# Altium PCB AltiumSTM32_PCB.PcbDoc
Units mm, origin at the board's own origin, x right, y up, seen from the top; angles counter-clockwise.
Board outline 40 x 40 mm, 4 copper layers (L1 (Signal), L2 (GND), L3 (GND), L4 (Signal)), stack 1.591 mm thick; 35 components, 27 nets, 170 pads, 151 vias.
Unrouted connection lines stored in the file: 3.
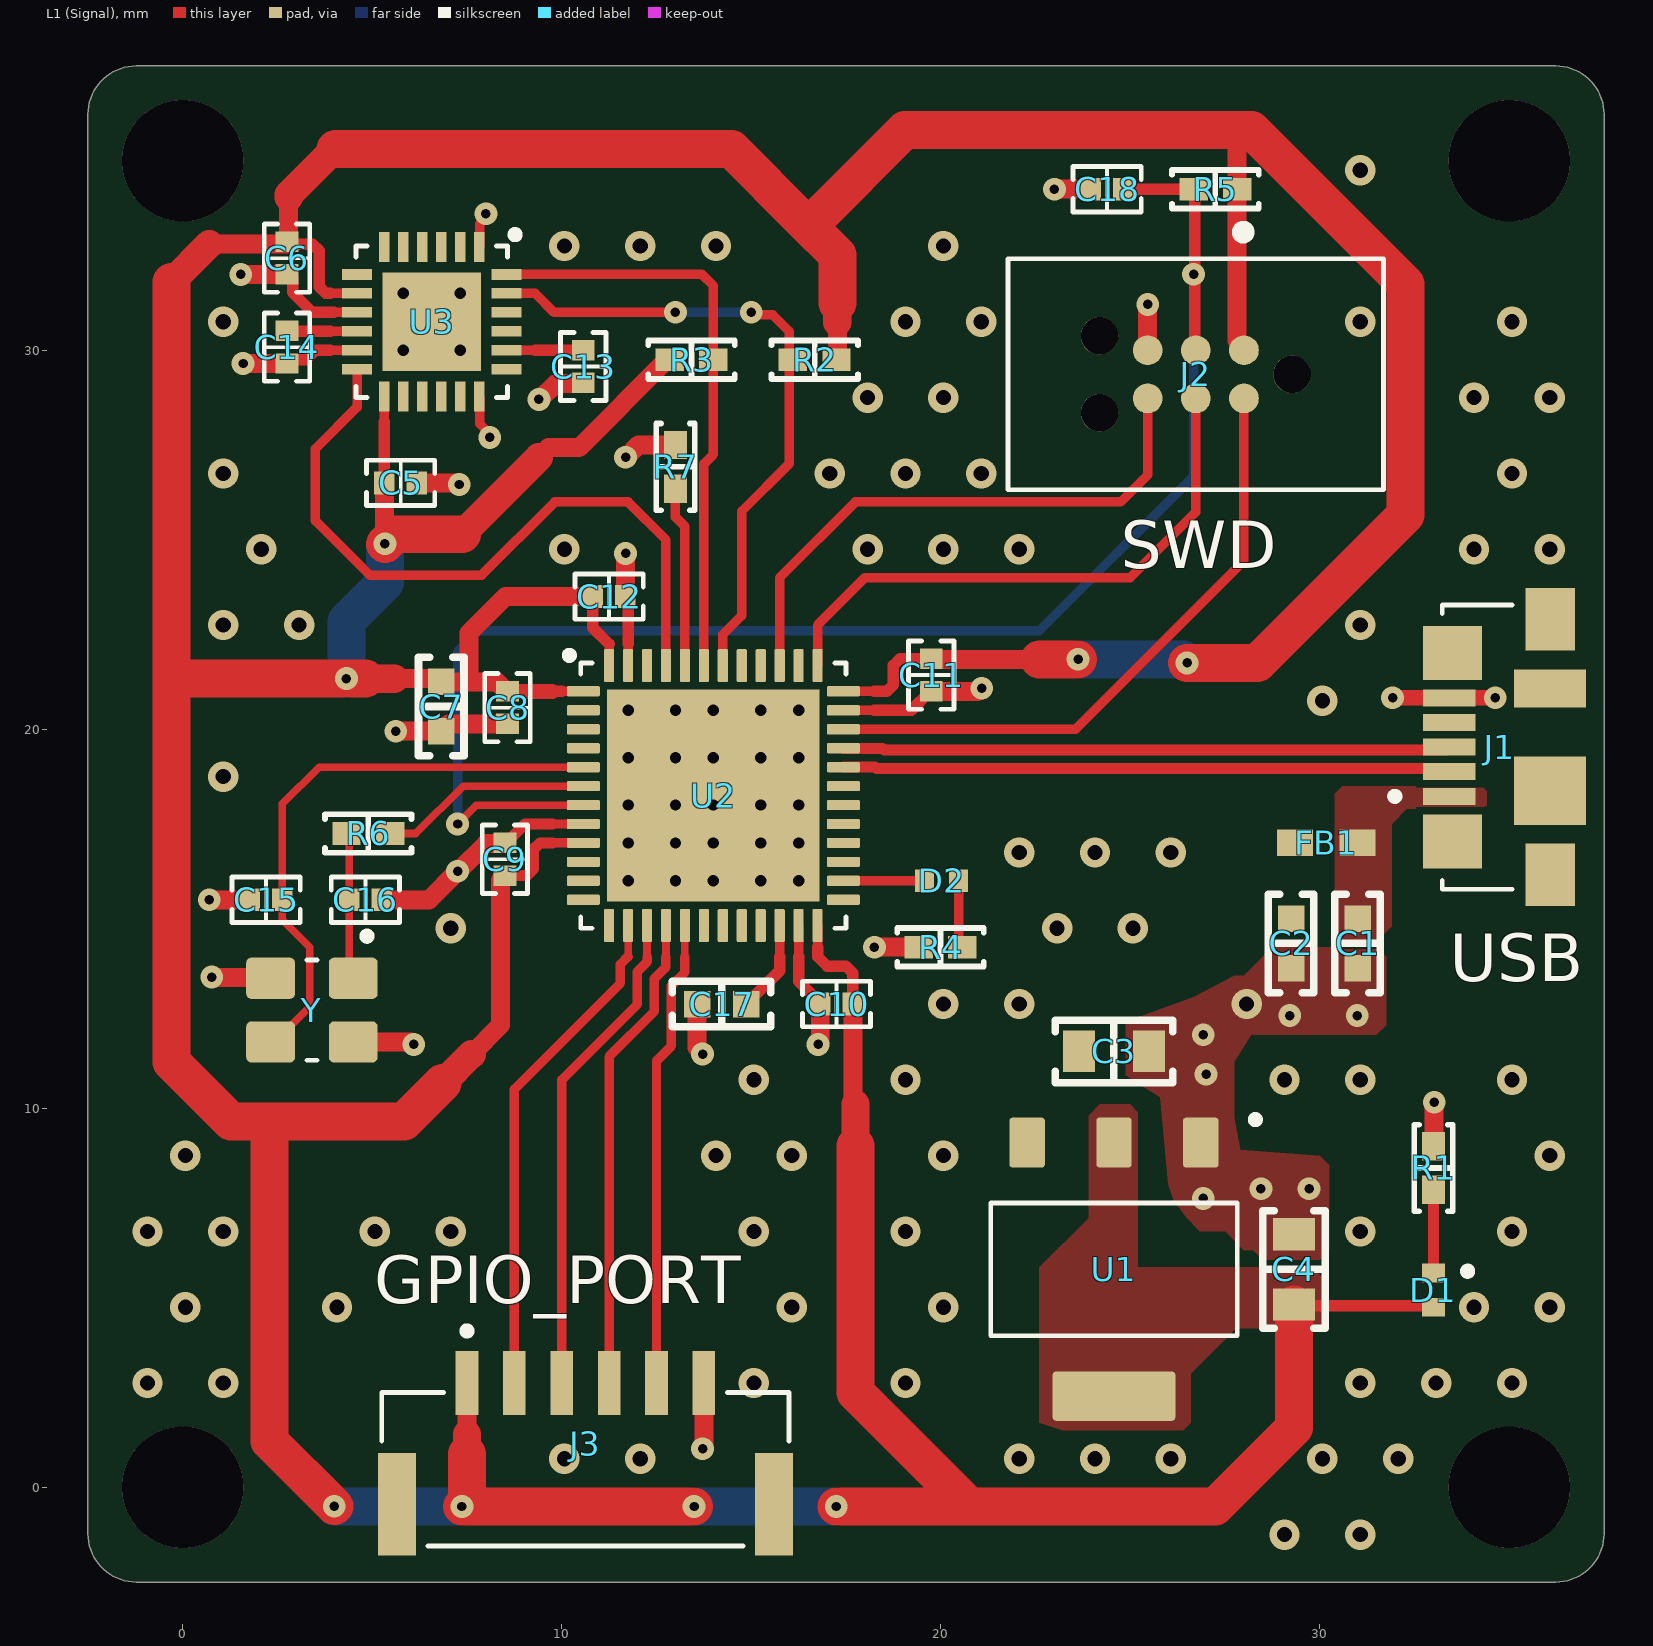
[diagram p0: L1 (Signal) view]
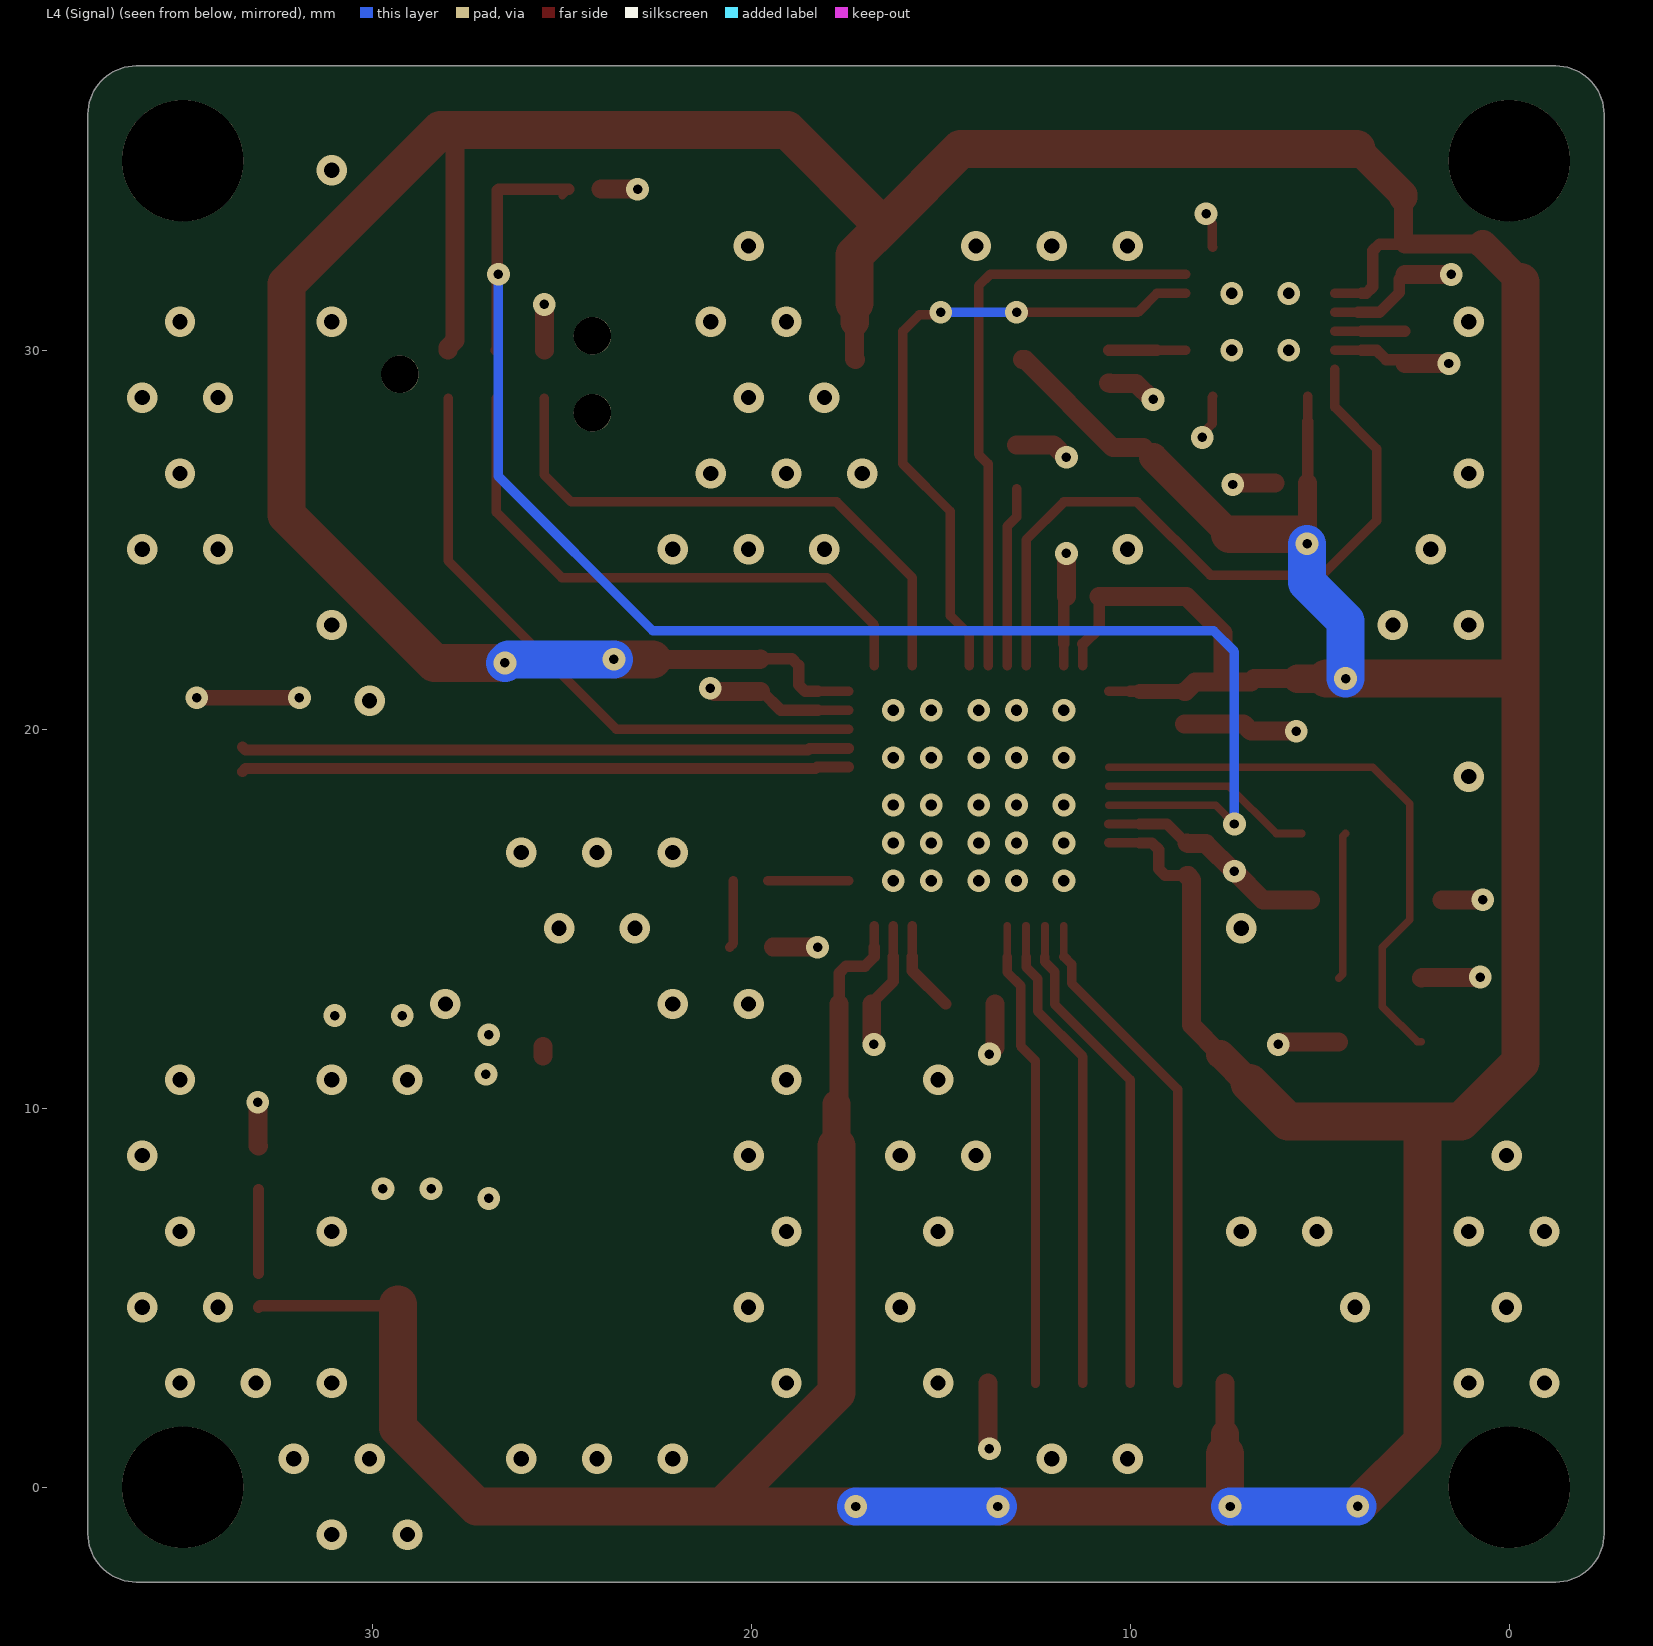
[diagram p1: L4 (Signal) view, seen from below]
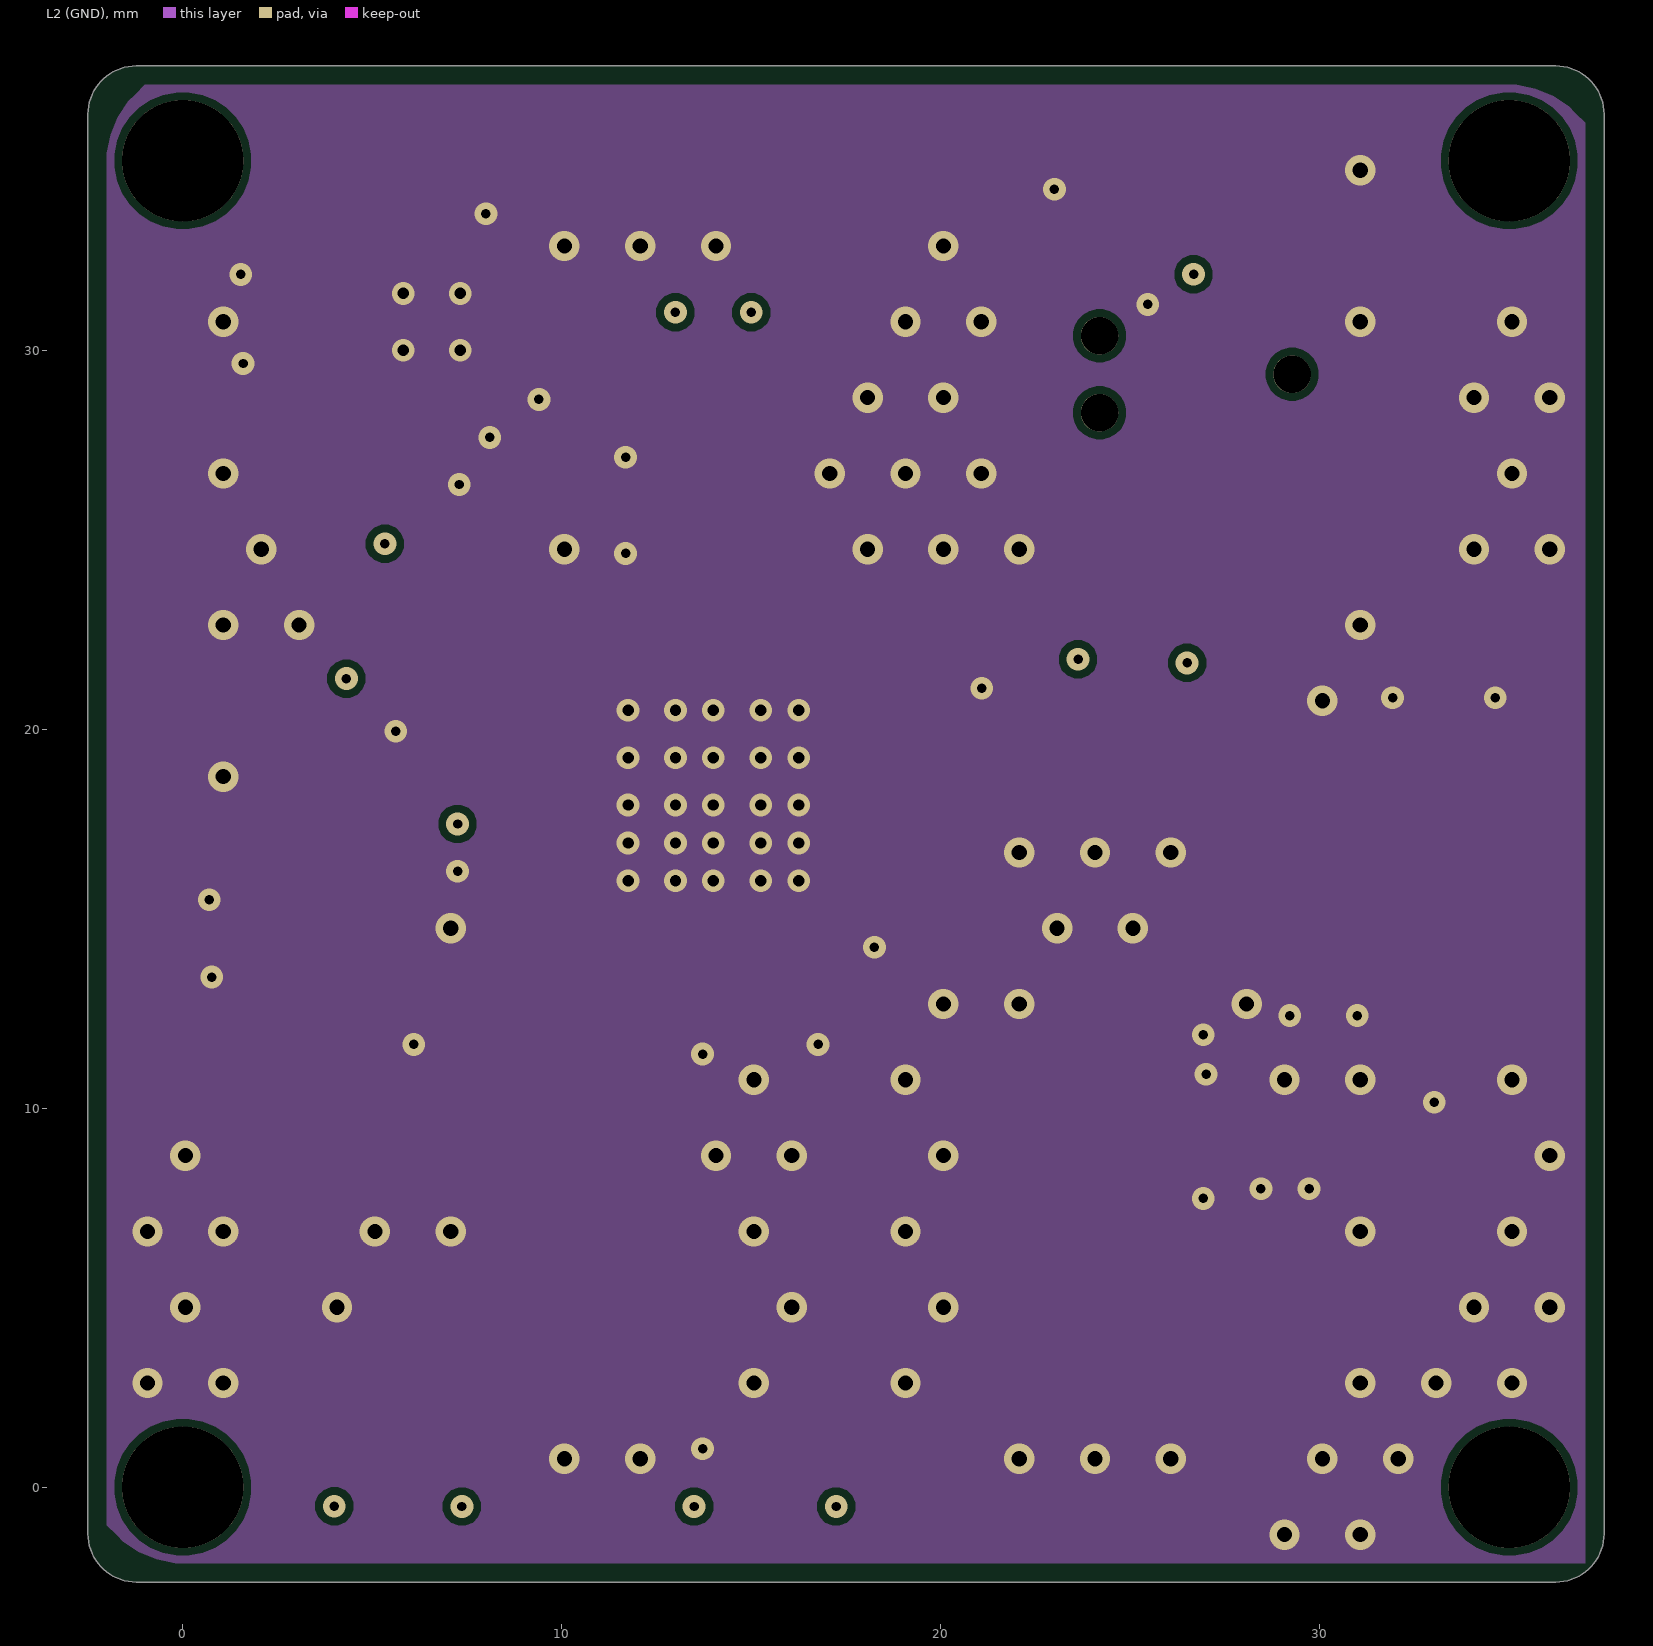
[diagram p2: L2 (GND)]
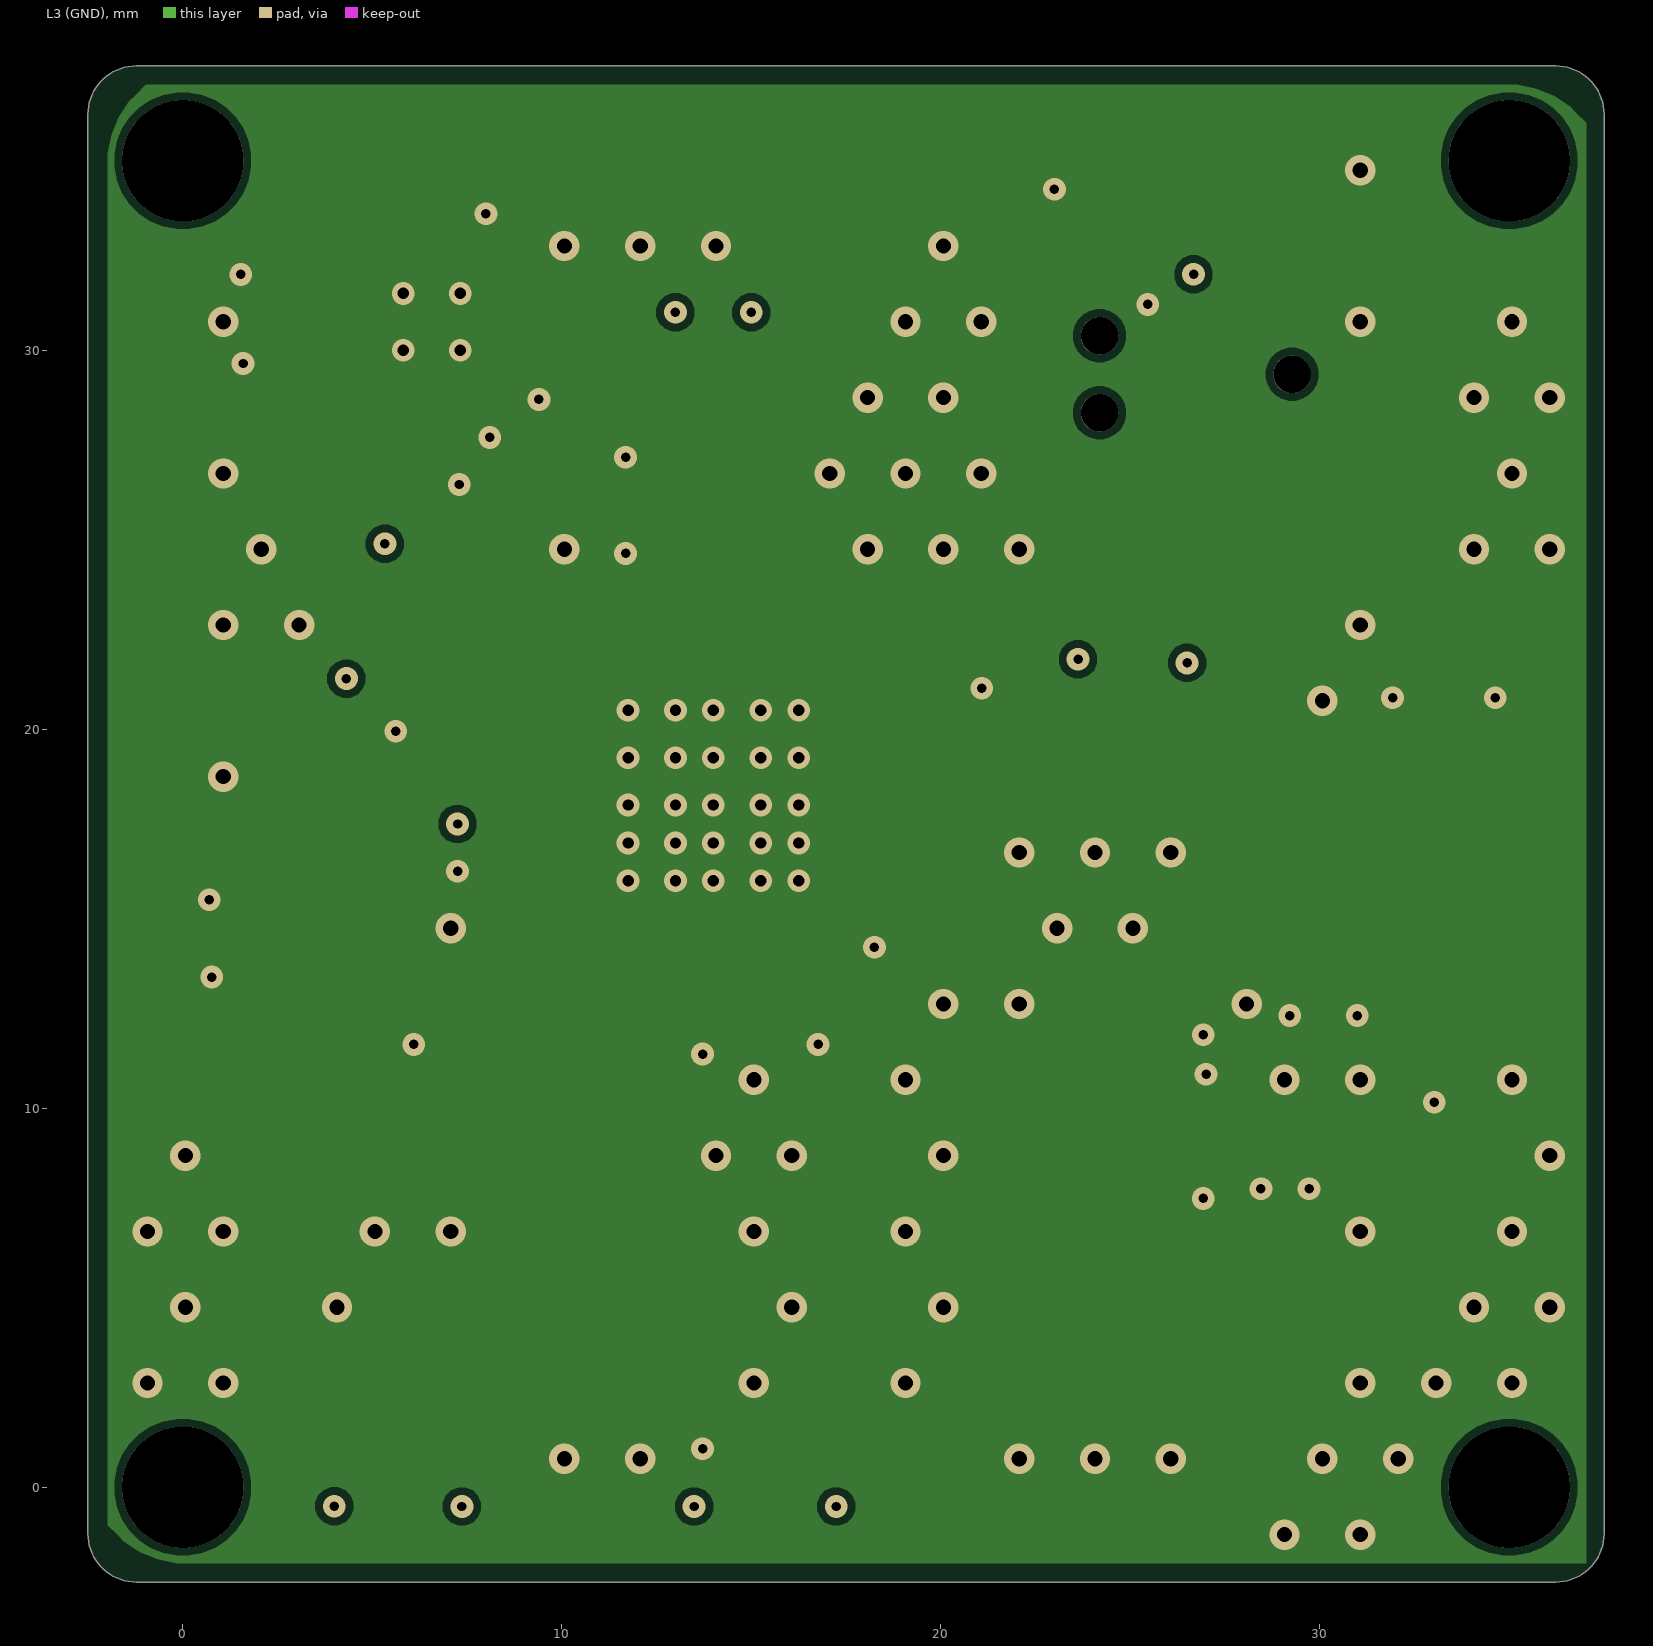
[diagram p3: L3 (GND)]

## Layer stack, top to bottom
Top Solder: solder mask 0.0254, SM-001, Dk 4
L1 (Signal): signal copper 0.035
Dielectric 1: prepreg 0.2104, PP-017, Dk 4.3
L2 (GND): signal copper 0.0175
Dielectric 3: core 1.065, Core-039, Dk 4.8
L3 (GND): signal copper 0.0175
Dielectric 5: prepreg 0.2104, PP-017, Dk 4.3
L4 (Signal): signal copper 0.035
Bottom Solder: solder mask 0.0254, SM-001, Dk 4

## Board outline
-2.5,-1.23 ccw(c-1.23,-1.23) -1.23,-2.5 36.23,-2.5 ccw(c36.23,-1.23) 37.5,-1.23 37.5,36.23 ccw(c36.23,36.23) 36.23,37.5 -1.23,37.5 ccw(c-1.23,36.23) -2.5,36.23

## Design rules (kind name [scope] priority, off if disabled: settings)
Clearance [All] p1: gap=0.2 ignorepadtopadclearanceinfootprint=TRUE except(0: Arc-Hole Track-Hole SMDPad-Hole THPad-Hole Via-Hole Fill-Hole Poly-Hole Region-Hole Text-Hole; 0.25: Via-Via)
DiffPairsRouting [All] p1: maxlimit=0.254 minlimit=0.203 mostfreqgap=0.254 toplayer_maxgap=0.203 toplayer_prefgap=0.203 toplayer_minwidth=0.287 toplayer_maxwidth=0.287 toplayer_prefwidth=0.287 bottomlayer_maxgap=0.203 bottomlayer_prefgap=0.203 bottomlayer_minwidth=0.287 bottomlayer_maxwidth=0.287 bottomlayer_prefwidth=0.287 impedanceprofiledriven=TRUE impedanceprofileid={58C25E6C-3278-4929-8B5A-89BDB804C8F2} impedanceprofilevalue=90.000000 maxuncoupledlength=12.7
HoleSize [All] p1: absolutevalues=TRUE maxlimit=6.3 minlimit=0.15 maxpercent=80.000 minpercent=20.000
HoleToHoleClearance [All] p1: gap=0.45 allowstackedmicrovias=TRUE
MinimumSolderMaskSliver [All] p1: minsoldermaskwidth=0
PolygonConnect [All] p1: connectstyle=Direct reliefconductorwidth=0.254 reliefentries=4 polygonreliefangle="90 Angle" airgapwidth=0.254
RoutingVias [All] p1: holewidth=0.3 width=0.7 viastyle="Through Hole" minholewidth=0.25 minwidth=0.55 maxholewidth=0.4 maxwidth=0.9
SilkToSilkClearance [All] p1: silktosilkclearance=0.15
SilkToSolderMaskClearance [IsPad] p1: minsilkscreentomaskgap=0.075 clearancetoexposedcopper=TRUE
SolderMaskExpansion [All] p1: expansion=0.102 istentingtop=FALSE
UnRoutedNet [All] p1: checkbadconnections=TRUE
Width [All] p1: maxlimit=1 minlimit=0.2 preferedwidth=0.3 midlayer1_minwidth=0.254 midlayer1_maxwidth=0.254 midlayer1_prefwidth=0.254 midlayer2_minwidth=0.254 midlayer2_maxwidth=0.254 midlayer2_prefwidth=0.254 minimp=50.000000 maximp=50.000000 favimp=50.000000
23 further rules are at their usual default settings.

## Classes and differential pairs
net class DIFF_USB: USB_D_N USB_D_P
differential pair USB_D: +USB_D_P -USB_D_N

## Components (designator, comment, footprint, x,y, rotation, side; value= is the part's Value field where it differs from the comment)
C1 "2u2F" C0603 31,14.35 r90 top
C2 "2u2F" C0603 29.245,14.35 r90 top
C3 "22uF" C0805 24.57,11.5 r180 top
C4 "22uF" C0805 29.32,5.75 r270 top
C5 "100nF" C0402 5.75,26.5 r0 top
C6 "10nF" C0402 2.75,32.43 r270 top
C7 "2u2F" C0603 6.82,20.6 r90 top
C8 "100nF" C0402 8.57,20.57 r90 top
C9 "100nF" C0402 8.5,16.57 r270 top
C10 "100nF" C0402 17.25,12.75 r0 top
C11 "100nF" C0402 19.75,21.43 r90 top
C12 "100nF" C0402 11.25,23.5 r180 top
C13 "2n2F" C0402 10.57,29.57 r90 top
C14 "100nF" C0402 2.75,30.08 r90 top
C15 "10pF" C0402 2.2,15.5 r0 top
C16 "10pF" C0402 4.82,15.5 r180 top
C17 "2u2F" C0603 14.22,12.75 r0 top
C18 "100nF" C0402 24.39,34.25 r0 top
D1 "SML-P11VTT86R" LED_SML-P11VTT86R 33,5.2 r270 top
D2 "SML-P11VTT86R" LED_SML-P11VTT86R 20.02,16 r180 top
FB1 "120R" WE-CBF_0603_W2.6 30.175,17 r180 top
J1 "47346-0001" MOLEX_47346-0001 36.08,19.53 r90 top
J2 "DNP" TAG_TC2030-IDC-NL 26.73,29.365 r180 top
J3 "SM06B-GHS-TB" JST_SM06B-GHS-TB 10.625,0.875 r0 top
R1 "1k" R0402_1005 33,8.425 r270 top
R2 "2k2" R0402_1005 16.675,29.75 r0 top
R3 "2k2" R0402_1005 13.425,29.75 r180 top
R4 "1k" R0402_1005 19.995,14.25 r0 top
R5 "10k" R0402_1005 27.245,34.25 r0 top
R6 "0R" R0402_1005 4.895,17.25 r0 top
R7 "10k" R0402_1005 13,26.925 r270 top
U1 "AMS1117-3.3" SOT229P700X180-4N 24.57,5.75 r270 top
U2 "STM32F411CEU6" QFN50P700X700X60-49N 14,18.25 r0 top
U3 "MPU-6050-A" QFN50P400X400X95-24N 6.57,30.75 r270 top
Y "TSX-322524.0000MF15X-AC3" OSCCC320X250X60 3.41,12.59 r270 top

## Footprints (in the part's own frame and the unit in brackets; to place one, negate y for a bottom-side part, rotate by r counter-clockwise, add the part's x,y. Pads: shape width x height; smd on the part's side, far side on the other; paste and mask are expansions set on the pad)
C0402 [mm]
  rect 0.54x0.6 smd paste+0 mask+0.102: 1(-0.43,0) 2(0.43,0)
  silkscreen extent -0.9,-0.6 0.9,0.6, body extent -0.5,-0.25 0.5,0.25, height 0.55
C0603 [mm] "Chip Capacitor, 2-Leads, Body 1.60x0.80mm, IPC Medium Density"
  rect 0.7x0.7 smd: 1(-0.65,0) 2(0.65,0)
  silkscreen extent -1.3,-0.6 1.3,0.6, body extent -0.8,-0.4 0.8,0.4, height 0.7
C0805 [mm] "J2, Film Capacitor PPS , 2-Leads, Body 2.00x1.25mm, IPC Medium Density"
  rect 0.85x1.1 smd: 1(-0.925,0) 2(0.925,0)
  silkscreen extent -1.55,-0.82 1.55,0.82, body extent -1,-0.62 1,0.62, height 1.2
JST_SM06B-GHS-TB [mm]
  rect 0.6x1.7 smd paste+0 mask+0.102: 1(-3.125,1.875) 2(-1.875,1.875) 3(-0.625,1.875) 4(0.625,1.875) 5(1.875,1.875) 6(3.125,1.875)
  rect 1x2.7 smd paste+0 mask+0.102: MP1(-4.975,-1.325) MP2(4.975,-1.325)
  silkscreen extent -5.38,-2.42 5.38,3.35, body extent -5.38,-2.05 5.38,2.8, height 4.25
LED_SML-P11VTT86R [mm]
  rect 0.5x0.6 smd: A(0.45,0) K(-0.45,0)
  silkscreen extent -0.6,0.8 -0.4,1, body extent -0.5,-0.3 0.5,0.3, height 0.21
MOLEX_47346-0001 [mm]
  rect 0.45x1.38 smd: 1(-1.3,2.66) 2(-0.65,2.66) 3(0,2.66) 4(0.65,2.66) 5(1.3,2.66)
  rect 1.425x1.55 smd: S1(-2.488,2.575) S2(2.488,2.575)
  rect 1.65x1.3 smd: S3(-3.375,0) S6(3.375,0)
  rect 1.8x1.9 smd: S4(-1.15,0)
  rect 1x1.9 smd: S5(1.55,0)
  silkscreen extent -3.75,1 3.75,4.2, body extent -4.05,-2.42 4.31,3.01, height 2.7
OSCCC320X250X60 [mm]
  rrect25% 1.09x1.29 smd: 1(-0.84,1.09) 2(-0.84,-1.09) 3(0.84,-1.09) 4(0.84,1.09)
  silkscreen extent -2.05,-0.13 1.33,1.55, body extent -1.25,-1.6 1.25,1.6, height 0.6
QFN50P400X400X95-24N [mm]
  rect 0.79x0.28 smd: 1(-1.97,1.25) 2(-1.97,0.75) 3(-1.97,0.25) 4(-1.97,-0.25) 5(-1.97,-0.75) 6(-1.97,-1.25) 13(1.97,-1.25) 14(1.97,-0.75) 15(1.97,-0.25) 16(1.97,0.25) 17(1.97,0.75) 18(1.97,1.25)
  rect 0.28x0.79 smd: 7(-1.25,-1.97) 8(-0.75,-1.97) 9(-0.25,-1.97) 10(0.25,-1.97) 11(0.75,-1.97) 12(1.25,-1.97) 19(1.25,1.97) 20(0.75,1.97) 21(0.25,1.97) 22(-0.25,1.97) 23(-0.75,1.97) 24(-1.25,1.97)
  rect 2.6x2.6 smd mask+0.07: 18(0,0)
  silkscreen extent -2.4,-2 2,2.3, body extent -2,-2 2,2, height 0.93
QFN50P700X700X60-49N [mm]
  rrect25% 0.87x0.27 smd: 1(-3.43,2.75) 2(-3.43,2.25) 3(-3.43,1.75) 4(-3.43,1.25) 5(-3.43,0.75) 6(-3.43,0.25) 7(-3.43,-0.25) 8(-3.43,-0.75) 9(-3.43,-1.25) 10(-3.43,-1.75) 11(-3.43,-2.25) 12(-3.43,-2.75) 25(3.43,-2.75) 26(3.43,-2.25) 27(3.43,-1.75) 28(3.43,-1.25) 29(3.43,-0.75) 30(3.43,-0.25) 31(3.43,0.25) 32(3.43,0.75) 33(3.43,1.25) 34(3.43,1.75) 35(3.43,2.25) 36(3.43,2.75)
  rrect25% 0.27x0.87 smd: 13(-2.75,-3.43) 14(-2.25,-3.43) 15(-1.75,-3.43) 16(-1.25,-3.43) 17(-0.75,-3.43) 18(-0.25,-3.43) 19(0.25,-3.43) 20(0.75,-3.43) 21(1.25,-3.43) 22(1.75,-3.43) 23(2.25,-3.43) 24(2.75,-3.43) 37(2.75,3.43) 38(2.25,3.43) 39(1.75,3.43) 40(1.25,3.43) 41(0.75,3.43) 42(0.25,3.43) 43(-0.25,3.43) 44(-0.75,3.43) 45(-1.25,3.43) 46(-1.75,3.43) 47(-2.25,3.43) 48(-2.75,3.43)
  rect 5.6x5.6 smd paste-4: 49(0,0)
  silkscreen extent -3.9,-3.5 3.5,3.8, body extent -3.5,-3.5 3.5,3.5, height 0.6
R0402_1005 [mm] "Chip Resistor, 2-Leads, Body 1.0x0.5mm, IPC Medium Density"
  rect 0.75x0.6 smd: 1(-0.575,0) 2(0.575,0)
  silkscreen extent -1.14,-0.51 1.14,0.51, body extent -0.5,-0.25 0.5,0.25, height 0.35
SOT229P700X180-4N [mm]
  rrect15% 1.31x0.93 smd: 1(-3.345,2.29) 2(-3.345,0) 3(-3.345,-2.29)
  rrect15% 1.31x3.24 smd: 2(3.345,0)
  silkscreen extent -4.05,-3.25 1.75,3.83, body extent -3.4,-3.25 3.6,3.25, height 1.8
TAG_TC2030-IDC-NL [mil]
  round 30.98 smd paste-39.37: 1(-50,-25) 2(-50,25) 3(0,-25) 4(0,25) 5(50,-25) 6(50,25)
  round 39.02 hole 39.02 unplated: ""(-100,0) ""(100,-40) ""(100,40)
  silkscreen extent -195,-154 195,120
WE-CBF_0603_W2.6 [mm]
  rect 0.95x0.7 smd: 1(-0.825,0) 2(0.825,0)
  body extent -0.8,-0.4 0.8,0.4, height 0.81

## Part data
C1 C2 C7 C17: library part CAP_0603_10V, "SMD Capacitor", Dielectric=?, Package=C0603, Voltage=10V, Excepted=?, Manufacturer Reference=?, Power=?, Tolerance=?
C3 C4: library part CAP_0805_16V, "SMD Capacitor", Dielectric=?, Package=C0805, Voltage=16V, Excepted=?, Manufacturer Reference=?, Power=?, Tolerance=?
C5 C6 C8 C9 C10 C11 C12 C13 C14 C18: library part CAP_0402_10V, "SMD Capacitor", Dielectric=?, Package=C0402, Tolerance=10%, Voltage=10V, Excepted=?, Manufacturer Reference=?, Power=?
C15 C16: library part CAP_0402_16V, "SMD Capacitor", Dielectric=?, Package=C0402, Voltage=16V, Excepted=?, Manufacturer Reference=?, Power=?, Tolerance=?
D1 D2: "Red 626nm LED Indication SMD - Discrete 1.8V 0402 (1006 Metric)", Package="0402 Rohm", Check_prices=https://www.snapeda.com/parts/SML-P11VTT86R/Rohm/view-part/?ref=eda, Digi-Key_Part_Number=846-SML-P11VTT86RTR-ND, MF=Rohm, MP=SML-P11VTT86R, Purchase-URL=https://pricing.snapeda.com/search?q=SML-P11VTT86R&ref=eda, SnapEDA_Link=https://www.snapeda.com/parts/SML-P11VTT86R/Rohm/view-part/?ref=snap
FB1: library part 742792625, "Multilayer Chip Ferrite Bead 0603 120R 2A", Package="0603 Wurth Elektronik", Check_prices=https://www.snapeda.com/parts/742792625/W%25C3%25BCrth+Elektronik+Midcom/view-part/?ref=eda, MF="WÃ¼rth Elektronik", MP=742792625, SnapEDA_Link=https://www.snapeda.com/parts/742792625/W%25C3%25BCrth+Elektronik+Midcom/view-part/?ref=snap
J1: "Conn Data USB Micro B w/Flange SMT Bottom Mnt LF", Package=None, Check_prices=https://www.snapeda.com/parts/47346-0001/Molex/view-part/?ref=eda, MF=Molex, MP=47346-0001, SnapEDA_Link=https://www.snapeda.com/parts/47346-0001/Molex/view-part/?ref=snap
J2: library part TC2030-NL, "Tag connect , CABLE ADAPTER 6 POS", Package=None, Availability=Unavailable, MP=TC2030-IDC-NL, Price=None
J3: "Connector Header Surface Mount, Right Angle 6 position 0.049 (1.25mm)", Package=None, Check_prices=https://www.snapeda.com/parts/SM06B-GHS-TB/JST/view-part/?ref=eda, MF="JST Sales", MP=SM06B-GHS-TB, SnapEDA_Link=https://www.snapeda.com/parts/SM06B-GHS-TB/JST/view-part/?ref=snap
R1 R2 R3 R4 R5 R6 R7: library part Resistor, "SMD Resistor", Dielectric=?, Excepted=?, Manufacturer Reference=?, Package=?, Power=?, Tolerence=?, Voltage=?
U1: "Sot223/Pkg 1-Amp 3.3-Volt Low Drop Out Voltage Regulatator", Package="SOT-223 Seeed Technology", Check_prices=https://www.snapeda.com/parts/AMS1117-3.3/Advanced+Monolithic+Systems/view-part/?ref=eda, MF="Advanced Monolithic Systems", MP=AMS1117-3.3, SnapEDA_Link=https://www.snapeda.com/parts/AMS1117-3.3/Advanced+Monolithic+Systems/view-part/?ref=snap
U2: "High-performance access line, ARM Cortex-M4 core with DSP and FPU, 512 Kbytes Flash, 100 MHz CPU, ART Accelerator", Package=None, Availability=Unavailable, MP=STM32F411CEU6, Price=None
U3: Package=None, Check_prices=https://www.snapeda.com/parts/MPU-6050-A/InvenSense/view-part/?ref=eda, MF="TDK InvenSense", MP=MPU-6050-A, SnapEDA_Link=https://www.snapeda.com/parts/MPU-6050-A/InvenSense/view-part/?ref=snap
Y: "24MHz Â±10ppm Crystal 9pF 40 Ohms 4-SMD, No Lead", Package="SMD-4 EPSON", Availability=Unavailable, MF=EPSON, MP="TSX-3225 24.0000MF15X-AC3", Price=None, SnapEDA_Link=https://www.snapeda.com/parts/TSX-3225%2024.0000MF15X-AC3/EPSON/view-part/230042/?ref=snap

## Free pads (board coordinates)
  round 3.2 hole 3.2 unplated: MH(0,0) MH(0,35) MH(35,0) MH(35,35)

## Via types
v1: diameter 0.8, hole 0.4, L1 (Signal) to L4 (Signal), tented both sides, 80 vias
v2: diameter 0.6, hole 0.25, L1 (Signal) to L4 (Signal), 42 vias
v3: diameter 0.6, hole 0.3, L1 (Signal) to L4 (Signal), 29 vias

## Nets (pads, with @x,y where several pads share a name; then routed paths per layer and width w, separated by ;. In a path a pad name is that pad's centre, name@x,y a point inside that pad or via, vN(x,y) a via of type N, cw(c..) or ccw(c..) an arc to the next point about the centre after c; other vN are vias at no path point)
+3V3: C4.2 C5.1 C6.1 C7.2 C8.2 C9.2 C10.2 C11.2 C12.2 D1.A J2.1 J3.1 R2.2 R3.2 R5.2 U1.2 U2.1 U2.9 U2.24 U2.36 U2.48 U3.8 U3.13 | length 211.9
  L1 (Signal) w0.25: 3.9,31.5 U3.8 ; 5.32,28.12 U3.13 ; 9.75,17 U2.9 ; 10,21 U2.1 ; U2.48 11.25,22.25 ; 16.75,14.25 U2.24 ; U2.36 18.25,21
  L1 (Signal) w0.3: C6.1@2.81,32.8 3.424,32.8 3.6,32.624 3.6,31.676 3.776,31.5 3.9,31.5 ; C5.1 5.32,28.12 ; C9.2 9.074,16.14 9.25,16.316 9.25,16.824 9.426,17 9.75,17 ; 9.75,21 10,21 ; C12.2 10.82,22.68 11.25,22.25 ; 16.75,14.25 16.75,14 17,13.75 17.5,13.75 17.68,13.57 C10.2 ; 18.25,21 18.574,21 18.75,21.176 18.75,21.684 18.926,21.86 C11.2 ; C4.2 29.357,4.788 32.962,4.788 D1.A
  L1 (Signal) w0.4: C8.2 9.75,21
  L1 (Signal) w0.5: 0.7,32.8 C6.1@2.75,32.8 ; C6.1@2.794,32.88 2.794,34.036 ; C5.1 5.327,26.493 5.327,24.899 v2(5.334,24.892) ; 5.588,21.336 6.734,21.336 C7.2 7.555,21.25 ; 7.5,1.404 J3.1 ; 7.62,11.43 8.382,12.192 8.382,16.022 8.45,16.09 8.45,16.12 8.47,16.14 C9.2 ; C8.2 8.54,21 8.29,21.25 7.555,21.25 ; 9.398,27.178 9.652,27.432 10.457,27.432 12.775,29.75 R3.2 ; C12.2 8.514,23.5 7.555,22.541 7.555,21.25 ; R2.2 17.272,29.772 17.272,30.734 ; C10.2 17.68,10.18 17.75,10.11 ; C11.2 19.766,21.844 22.606,21.844 ; 27.686,35.814 27.82,35.68 27.82,30.258 28,30.078 J2.1
  L1 (Signal) w0.75: -0.3,31.8 0.7,32.8 ; 2.794,34.036 2.794,34.105 3.995,35.306 4.028,35.306 ; 4.826,21.336 5.588,21.336 ; 6.858,10.668 7.62,11.43 ; 7.366,25.146 9.398,27.178 ; 7.5,0.882 7.5,1.404 ; 17.272,30.734 17.272,31.242 ; 17.75,9 17.75,10.11
  L1 (Signal) w1: -0.3,31.8 -0.3,21.336 ; v2(4,-0.5) 2.286,1.214 2.286,9.652 ; 4.028,35.306 14.478,35.306 16.383,33.401 ; 4.826,21.336 v2(4.318,21.336) -0.3,21.336 ; v2(5.334,24.892) 5.588,25.146 7.366,25.146 ; 6.858,10.668 5.842,9.652 2.286,9.652 ; 7.5,0.882 7.5,-0.374 v2(7.366,-0.508) v2(13.492,-0.508) ; v2(17.242,-0.508) 20.758,-0.508 ; 17.272,31.242 17.272,32.512 16.383,33.401 ; 17.75,9 17.75,2.5 20.758,-0.508 ; 22.606,21.844 v2(23.622,21.844) ; v2(26.5,21.75) 28.354,21.75 32.258,25.654 32.258,31.75 28.194,35.814 27.686,35.814 19.05,35.814 16.637,33.401 16.383,33.401 ; C4.2 29.32,1.57 27.242,-0.508 20.828,-0.508 20.758,-0.508 ; -0.3,21.336 -0.3,11.222 1.27,9.652 2.286,9.652
  L4 (Signal) w1: v2(4,-0.5) 4.008,-0.508 v2(7.366,-0.508) ; v2(4.318,21.336) 4.318,22.86 5.334,23.876 v2(5.334,24.892) ; v2(13.492,-0.508) v2(17.242,-0.508) ; v2(23.622,21.844) 26.406,21.844 v2(26.5,21.75)
+5V: C2.2 C3.2 FB1.2 U1.3
GND: C1.1 C2.1 C3.1 C4.1 C5.2 C6.2 C7.1 C8.1 C9.1 C10.1 C11.1 C12.1 C13.1 C14.1 C15.1 C16.1 C17.1 C18.1 J1.5 J2.5 J3.6 R1.1 R4.1 R7.1 U1.1 U2.8 U2.23 U2.35 U2.47 U2.49 U3.1 U3.9 U3.11 U3.18 Y.2 Y.4 | length 47.1
  L1 (Signal) w0.25: 3.9,30 U3.11 ; 3.985,31 U3.9 ; U3.18@7.82,28.78 7.835,28.765 7.835,28.06 8.1,27.795 v2(8.1,27.7) ; U3.1 7.835,32.735 7.835,33.34 8,33.505 v2(8,33.6) ; 9.75,17.5 U2.8 ; U2.47 11.75,22.25 ; 16.25,14 U2.23 ; U2.35 18.25,20.5
  L1 (Signal) w0.3: C14.1 2.853,29.753 3.253,29.753 3.5,30 3.9,30 ; C6.2@2.9,31.88 2.9,31.525 3.425,31 3.985,31 ; C9.1 8.53,17 9.03,17.5 9.75,17.5 ; C12.1 11.75,23.43 11.75,22.25 ; 16.25,14 16.25,13.35 16.82,12.78 C10.1 ; 18.25,20.5 19.22,20.5 19.72,21 C11.1
  L1 (Signal) w0.4: v2(31.92,20.83) J1.5 v2(34.63,20.83) v2@34.65,20.83
  L1 (Signal) w0.5: v2(0.7,15.499) C15.1@1.769,15.499 ; v2(0.762,13.462) 0.778,13.446 2.304,13.446 Y.2 ; v2(1.528,32) C6.2 ; v2(1.592,29.65) C14.1 ; Y.4 6.003,11.75 6.069,11.684 v2(6.096,11.684) ; C16.1 6.5,15.5 v2(7.25,16.25) 7.275,16.25 8.005,16.98 8.48,16.98 C9.1 ; v2(5.621,19.95) C7.1 7.01,20.14 C8.1 ; C5.2 7.228,26.5 7.27,26.458 v2(7.297,26.458) ; v2(9.398,28.702) 9.425,28.702 9.843,29.12 10.52,29.12 10.54,29.14 C13.1 ; C12.1 11.682,23.502 11.682,24.636 v2(11.684,24.638) ; v2(11.684,27.178) 11.701,27.178 12.023,27.5 R7.1 ; C17.1 13.57,11.603 13.716,11.457 v2(13.716,11.43) ; v2(13.716,1.016) 13.716,1.043 13.75,1.077 J3.6 ; v2(16.764,11.684) 16.764,11.711 16.82,11.767 C10.1 ; v2(18.25,14.25) R4.1 ; C11.1 20.973,21 21.055,21.082 v2(21.082,21.082) ; v2(23,34.25) C18.1 ; J2.5 v2(25.46,31.21) ; C3.1@25.495,11.375 C3.1 C3.1@25.495,11.625 ; R1.1 33.01,9.01 33.01,10.15 v2(33.02,10.16)
  other v1: 29.07,-1.25 31.07,-1.25 10.07,0.75 12.07,0.75 22.07,0.75 24.07,0.75 26.07,0.75 30.07,0.75 32.07,0.75 -0.93,2.75 1.07,2.75 15.07,2.75 19.07,2.75 31.07,2.75 33.07,2.75 35.07,2.75 0.07,4.75 4.07,4.75 16.07,4.75 20.07,4.75 34.07,4.75 36.07,4.75 -0.93,6.75 1.07,6.75 5.07,6.75 7.07,6.75 15.07,6.75 19.07,6.75 31.07,6.75 35.07,6.75 0.07,8.75 14.07,8.75 16.07,8.75 20.07,8.75 36.07,8.75 15.07,10.75 19.07,10.75 29.07,10.75 31.07,10.75 35.07,10.75 20.07,12.75 22.07,12.75 28.07,12.75 7.07,14.75 23.07,14.75 25.07,14.75 22.07,16.75 24.07,16.75 26.07,16.75 1.07,18.75 30.07,20.75 1.07,22.75 3.07,22.75 31.07,22.75 2.07,24.75 10.07,24.75 18.07,24.75 20.07,24.75 22.07,24.75 34.07,24.75 36.07,24.75 1.07,26.75 17.07,26.75 19.07,26.75 21.07,26.75 35.07,26.75 18.07,28.75 20.07,28.75 34.07,28.75 36.07,28.75 1.07,30.75 19.07,30.75 21.07,30.75 31.07,30.75 35.07,30.75 10.07,32.75 12.07,32.75 14.07,32.75 20.07,32.75 31.07,34.75
  other v2: 26.924,7.62 28.448,7.874 29.718,7.874 27,10.9 26.924,11.938 29.21,12.446 30.988,12.446
  other v3: 11.75,16 13,16 14,16 15.25,16 16.25,16 11.75,17 13,17 14,17 15.25,17 16.25,17 11.75,18 13,18 14,18 15.25,18 16.25,18 11.75,19.25 13,19.25 14,19.25 15.25,19.25 16.25,19.25 11.75,20.5 13,20.5 14,20.5 15.25,20.5 16.25,20.5 5.82,30 7.32,30 5.82,31.5 7.32,31.5
IMU_CPOUT: C13.2 U3.20 | length 2
  L1 (Signal) w0.25: U3.20 9.3,30
  L1 (Signal) w0.3: 9.3,30 C13.2
IMU_INT: U2.45 U3.12 | length 18.8
  L1 (Signal) w0.25: U3.12 4.6,28.5 3.5,27.4 3.5,25.5 4.933,24.067 7.885,24.067 9.818,26 11.75,26 12.75,25 U2.45
IMU_REGOUT: C14.2 U3.10 | length 1.8
  L1 (Signal) w0.25: 3.9,30.5 U3.10
  L1 (Signal) w0.3: C14.2@2.76,30.5 3.9,30.5
IMU_SCL: R2.1 U2.42 U3.23 | length 17.4
  L1 (Signal) w0.25: U3.23 9.3,31.5 9.8,31 v2(13,31) ; U2.42 14.25,22.5 14.75,23 14.75,25.75 16,27 16,29.75 16,30.5 15.567,30.933 15.067,30.933 v2(15,31)
  L4 (Signal) w0.25: v2(13,31) v2(15,31)
IMU_SDA: R3.1 U2.43 U3.24 | length 15.7
  L1 (Signal) w0.25: U3.24 13.7,32 14,31.7 R3.1 14,27.25 13.75,27 U2.43
LED_PWR_K: D1.K R1.2 | length 2.2
  L1 (Signal) w0.3: D1.K R1.2
MCU_BOOT0: R7.2 U2.44 | length 4.8
  L1 (Signal) w0.25: R7.2 13,25.6 13.25,25.35 U2.44
MCU_LED_A: D2.A U2.26 | length 2.1
  L1 (Signal) w0.25: U2.26 D2.A
MCU_LED_K: D2.K R4.2 | length 1.8
  L1 (Signal) w0.25: D2.K 20.47,14.35 R4.2
MCU_NRST: C18.2 J2.3 R5.1 U2.7 | length 41.1
  L1 (Signal) w0.2: v2(7.25,17.5) 7.75,18 U2.7 ; C18.2 C18.2@24.99,34.08
  L1 (Signal) w0.3: C18.2 R5.1 26.7,34.22 26.7,30.03 J2.3
  L4 (Signal) w0.25: v2(7.25,17.5) 7.25,22.05 7.8,22.6 22.6,22.6 26.67,26.67 v2(26.67,32.004)
MCU_OSC_IN: C15.2 U2.5 Y.3 | length 15.4
  L1 (Signal) w0.2: Y.3 2.42,11.75 3.35,12.68 3.35,14.25 2.63,14.97 C15.2 2.63,18.03 3.6,19 U2.5
MCU_OSC_OUT: R6.2 U2.6 | length 5.6
  L1 (Signal) w0.2: R6.2 6.151,17.25 7.401,18.5 U2.6
MCU_PA4: J3.2 U2.14 | length 13.3
  L1 (Signal) w0.2: 11.75,14 U2.14
  L1 (Signal) w0.25: J3.2 8.75,10.5 11.545,13.295 11.545,13.795 11.75,14
MCU_PA5: J3.3 U2.15 | length 13
  L1 (Signal) w0.2: 12.25,14 U2.15
  L1 (Signal) w0.25: J3.3 10,10.75 11.995,12.745 11.995,13.607 12.25,13.862 12.25,14
MCU_PA6: J3.4 U2.16 | length 12.7
  L1 (Signal) w0.2: 12.75,14 U2.16
  L1 (Signal) w0.25: J3.4 11.25,11.364 12.445,12.559 12.445,13.421 12.75,13.726 12.75,14
MCU_PA7: J3.5 U2.17 | length 12.4
  L1 (Signal) w0.2: 13.25,14 U2.17
  L1 (Signal) w0.25: J3.5 12.5,11.25 12.895,11.645 12.895,13.235 13.25,13.59 13.25,14
MCU_SWCLK: J2.4 U2.37 | length 15.3
  L1 (Signal) w0.25: U2.37 16.75,22.75 18,24 25,24 26.73,25.73 J2.4
MCU_SWDIO: J2.2 U2.34 | length 16.7
  L1 (Signal) w0.25: U2.34 17.813,20 23.556,20 28,24.444 J2.2
MCU_SWO: J2.6 U2.39 | length 15.2
  L1 (Signal) w0.25: U2.39 15.75,24 17.75,26 24.75,26 25.46,26.71 J2.6
MCU_VCAP1: C17.2 U2.22 | length 2.4
  L1 (Signal) w0.25: 15.75,14 U2.22
  L1 (Signal) w0.3: C17.2 15.75,13.63 15.75,14
USB_D_N: J1.2 U2.32 | length 16
  L1 (Signal) w0.287: U2.32 17.435,19.005 18.258,19.005 18.303,18.96 33.34,18.96 J1.2
USB_D_P: J1.3 U2.33 | length 16
  L1 (Signal) w0.287: U2.33 17.435,19.495 18.461,19.495 18.506,19.45 33.34,19.45 J1.3
VBUS: C1.2 FB1.1 J1.1
XTAL_IN: C16.2 R6.1 Y.1 | length 3.9
  L1 (Signal) w0.2: R6.1 4.39,17.18 C16.2 4.39,13.54 Y.1
pads on no net: J1.4 J1.S1 J1.S2 J1.S3 J1.S4 J1.S5 J1.S6 J2. J3.MP1 J3.MP2 U2.2 U2.3 U2.4 U2.10 U2.11 U2.12 U2.13 U2.18 U2.19 U2.20 U2.21 U2.25 U2.27 U2.28 U2.29 U2.30 U2.31 U2.38 U2.40 U2.41 U2.46 U3.2 U3.3 U3.4 U3.5 U3.6 U3.7 U3.14 U3.15 U3.16 U3.17 U3.19 U3.21 U3.22

## Polygon pours and split planes (outlines as drawn)
GND on L1 (Signal) "GND_L01_P006" (solid, pour order 6): 30,6 30.25,6.25 30.25,8.5 30,8.75 27.9,8.9 27.75,9.75 27.75,10 27.75,11.23 28.188,11.938 31.496,11.938 31.75,12.192 31.75,14 31.5,14.25 28.75,14.25 28.25,13.75 28,13.5 27.75,13.5 26.687,12.937 24.986,12.321 24.88,12.249 24.88,10.87 25.3,10.6 25.79,10.285 26,8 26.136,7.594 26.458,7.132 26.839,6.75 27.5,6.75 28,6.25 28.25,6.25 28.5,6
+3V3 on L1 (Signal) "+3V3_L01_P002" (solid, pour order 2): 22.7,1.5 26.4,1.5 26.6,1.7 26.6,3 27.8,4.2 30,4.2 30.2,4.4 30.2,5.4 29.8,5.8 25.2,5.8 25.2,9.9 25,10.1 24.2,10.1 23.9,9.8 23.9,7.1 22.6,5.8 22.6,1.7 23.2,1.5
VBUS on L1 (Signal) "VBUS_L01_P000" (solid, pour order 0): 30.6,18.5 30.4,18.3 30.4,14.5 30.5,14.4 31.5,14.4 31.9,14.8 31.9,17.5 32.3,17.9 34.3,17.9 34.4,18 34.4,18.4 34.3,18.5
GND on L2 (GND) "GND_L02_P003" (solid, pour order 3): -2,34.948 cw(c0.54,34.948) -1.256,36.744 -1,37 34.948,37 cw(c34.948,34.46) 36.744,36.256 37,36 37,-2 0.052,-2 cw(c0.052,0.54) -1.744,-1.256 -2,-1
GND on L3 (GND) "GND_L03_P005" (solid, pour order 5): -1.974,34.948 cw(c0.566,34.948) -1.23,36.744 -0.974,37 34.974,37 cw(c34.974,34.46) 36.77,36.256 37.026,36 37.026,-2 0.078,-2 cw(c0.078,0.54) -1.718,-1.256 -1.974,-1

## Silkscreen, mask and mechanical layers (free items; w line width, h text height)
Top Overlay:
  text "SWD" at 24.75,24.25 h1.25
  text "USB" at 33.434,13.35 h1.25
  text "GPIO_PORT" at 5.05,4.858 h1.25
Mechanical 1:
  lines w0.3: -2.5,-1.23 ccw(c-1.23,-1.23) -1.23,-2.5 18.75,-2.5 35.25,-2.5 36.23,-2.5 ccw(c36.23,-1.23) 37.5,-1.23 37.5,36.23 ccw(c36.23,36.23) 36.23,37.5 -1.23,37.5 ccw(c-1.23,36.23) -2.5,36.23 -2.5,18.75 -2.5,-1.23

## Text inside footprints (layer, text, board x,y; h text height)
J1: Mechanical 13 "PCB EDGE" at 37.33,24.03 h0.41 r90